# EAGLE board fuente_buck_50v-12v_10A_v_1.1 (EAGLE 7.6.0)
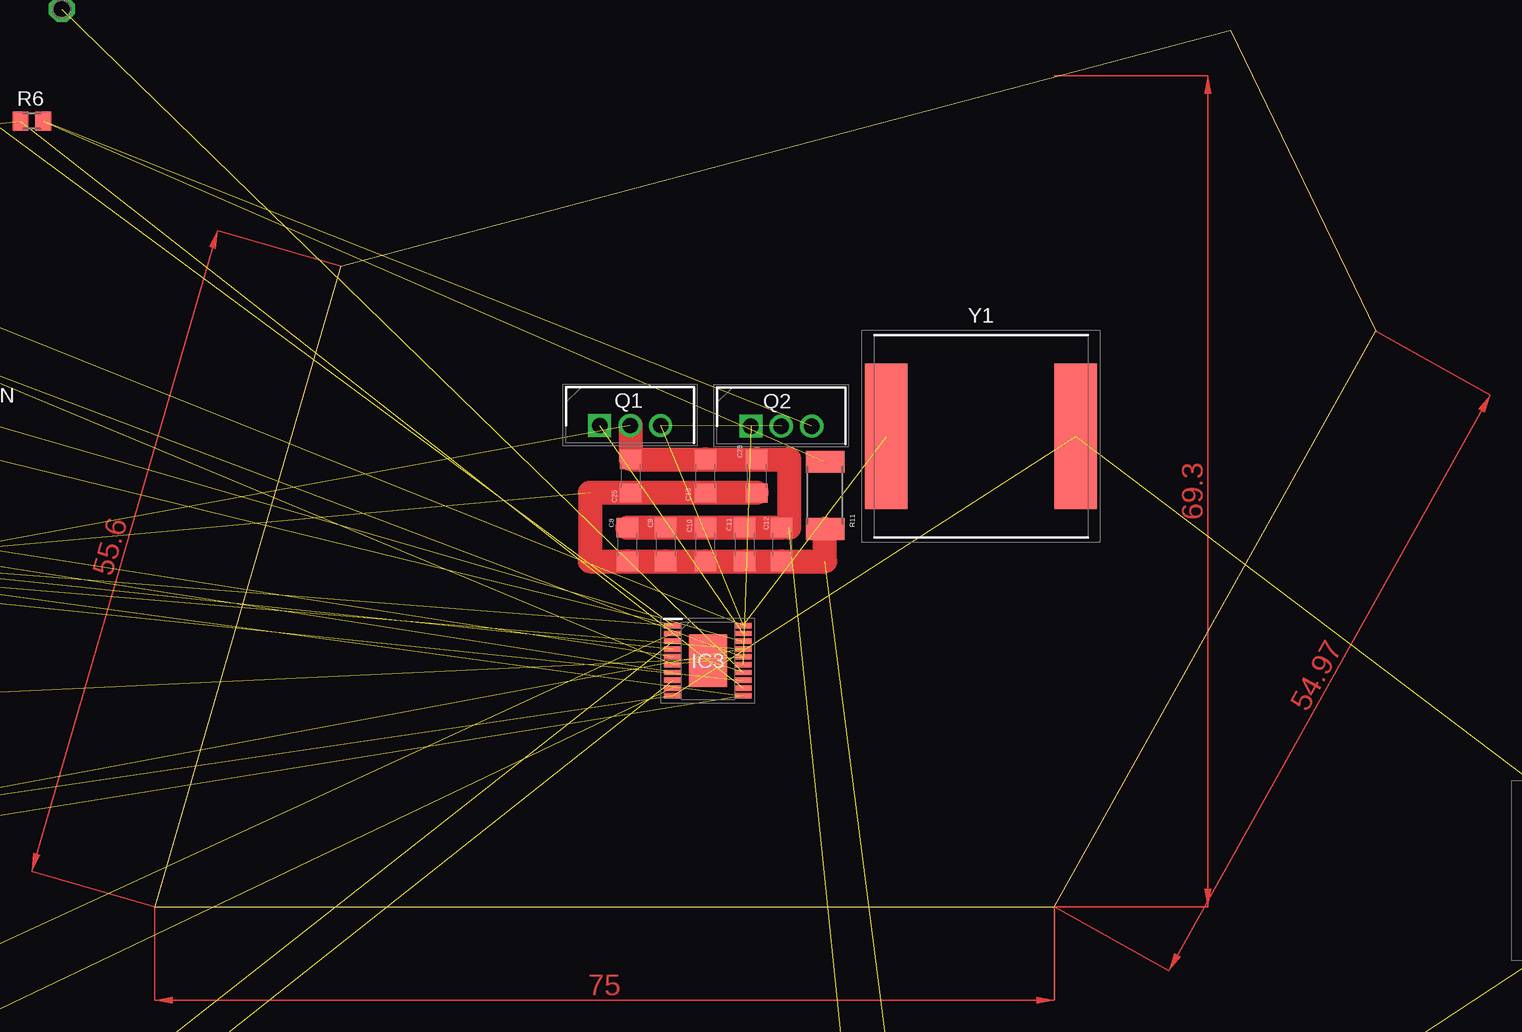
[diagram p0: board, top side]

Size 101.8 x 73.1 mm. Coordinates in mm from the lower left corner, seen from the top.
Outline: 0,0 75,0 101.8,48 89.7,73.1 15.5,53.4 0,0
Copper layers (1*16): Top 0.035mm / dielectric 1.5mm / Bottom 0.035mm
Design rules "default": minimum track width 10mil, minimum drill 24mil, track to track 8mil, track to pad 8mil, pad to pad 8mil, via to via 8mil, smd to smd 8mil, copper to edge 40mil, drill to drill 8mil, minimum pad ring 10mil, minimum via ring 8mil, stop-mask expansion 4mil, vias tented up to drill 0mil, thermal gap 10mil
Net classes: 0 default: width 0.152 mm, drill 0.305 mm, clearance 0.152 mm; 1 power: width 0.127 mm, drill 0.305 mm, clearance 0.127 mm; 2 thin: width 0.508 mm, drill 0.305 mm, clearance 0.152 mm

## Footprints (pad centres in the part's own frame; a part is rotated, then mirrored left to right if it is on the bottom)
2,54/1,1 = drill 1.118 pad 2.54 octagon: 1 0,0
C0805 = smd 1.3 x 1.5: 1 -0.95,0; 2 0.95,0
CAPC1608X90N = smd 0.54 x 0.94: 1 -0.8,0; 2 0.8,0
C1206 = smd 1.6 x 1.8: 1 -1.4,0; 2 1.4,0
EEE0JA152UAP = smd 4.1 x 2: 1 -4.35,0; 2 4.35,0
CAPC3216X180N = smd 1.05 x 1.82: 1 -1.39,0; 2 1.39,0
CAPAE1910X1750N = smd 8 x 2.4: 1 -6.95,0; 2 6.95,0
DIOM5127X229N = smd 2.2 x 1.55: 1 -2.05,0; 2 2.05,0
DIOM5436X261N = smd 2.2 x 2.15: 1 -2.2,0; 2 2.2,0
FUSC3216X123N = smd 1.55 x 1.91: 1 -1.285,0; 2 1.285,0
SOP65P640X110-21N = smd 1.45 x 0.45: 1 -2.925,2.925; 2 -2.925,2.275; 3 -2.925,1.625; 4 -2.925,0.975; 5 -2.925,0.325; 6 -2.925,-0.325; 7 -2.925,-0.975; 8 -2.925,-1.625; 9 -2.925,-2.275; 10 -2.925,-2.925; 11 2.925,-2.925; 12 2.925,-2.275; 13 2.925,-1.625; 14 2.925,-0.975; 15 2.925,-0.325; 16 2.925,0.325; 17 2.925,0.975; 18 2.925,1.625; 19 2.925,2.275; 20 2.925,2.925 | smd 3.15 x 4.35: 21 0,0
397400002 = drill 1.2 pad 1.8 square: 1 0,0 | drill 1.2 pad 1.8: 2 3.81,0
JP1 = drill 0.914 long: 1 0,-1.27; 2 0,1.27
TO254P470X1016X1611-3P = drill 1.28 pad 1.92 square: 1 0,0 | drill 1.28 pad 1.92: 2 2.54,0; 3 5.08,0
M0805 = smd 1.3 x 1.6: 1 -0.95,0; 2 0.95,0
R2512 = smd 1.8 x 3.2: 1 -2.8,0; 2 2.8,0
R0805 = smd 1.3 x 1.5: 1 -0.95,0; 2 0.95,0
P1-13 = drill 1.321 pad 2.159 octagon: TP 0,0
INDPM178169X700N = smd 3.55 x 12.1: 1 -7.9,0; 2 7.9,0

## Placement (x,y rotation side)
+12V  P3  [2,54/1,1]  -26.35,-49.85 0 top  (outside the outline)
C1  0.1uf-x7r _50v  [C0805]  -66.75,55.86 180 top  (outside the outline)
C2  1uf_25v  [C0805]  -48.92,58.24 0 top  (outside the outline)
C3  0.01UF  [C0805]  -84.4,40.53 90 top  (outside the outline)
C4  270PF  [C0805]  -76.05,40.53 90 top  (outside the outline)
C5  100pf_50v  [CAPC1608X90N]  -96.6,3 0 top  (outside the outline)
C6  3300pf_50v  [CAPC1608X90N]  -97.5,0.8 0 top  (outside the outline)
C7  N/A  [C0805]  -52.07,-34.29 0 top  (outside the outline)
C8  2.2uf_100v  [C1206]  39.4,30.2 270 top
C9  2.2uf_100v  [C1206]  42.6,30.2 270 top
C10  2.2uf_100v  [C1206]  45.9,30.2 270 top
C11  2.2uf_100v  [C1206]  49.2,30.2 270 top
C12  1uf_100v  [C1206]  52.3,30.2 270 top
C13  0.1uf_100v  [C1206]  45.9,35.9 270 top
C14  1uf_25v  [C0805]  -35.51,28.44 0 top  (outside the outline)
C15  100pf_50v  [CAPC1608X90N]  -99.3,-9.7 0 top  (outside the outline)
C16  330uf 35v  [EEE0JA152UAP]  119.3,2.7 270 top  (outside the outline)
C17  2.2uf_35v  [CAPC3216X180N]  19.5,-19.4 0 top  (outside the outline)
C18  2.2uf_35v  [CAPC3216X180N]  19.5,-22.7 0 top  (outside the outline)
C19  2.2uf_35v  [CAPC3216X180N]  19.4,-25.7 0 top  (outside the outline)
C20  2.2uf_35v  [CAPC3216X180N]  19.4,-28.9 0 top  (outside the outline)
C21  1uf_35v  [CAPC3216X180N]  19.4,-31.9 0 top  (outside the outline)
C22  1uf_35v  [CAPC3216X180N]  19.4,-35 0 top  (outside the outline)
C23  220pf_50v  [C0805]  -101,-5.5 0 top  (outside the outline)
C24  47pf_50v  [CAPC1608X90N]  -98.9,-1.4 0 top  (outside the outline)
C25  1uf_100v  [C1206]  39.7,35.9 270 top
C26  330uf_100v  [CAPAE1910X1750N]  -105.2,43.2 0 top  (outside the outline)
C28  1uf_100v  [C1206]  50.2,35.9 270 top
D1  SS16-E3_61T  [DIOM5127X229N]  -70.4,15.1 180 top  (outside the outline)
D2  SS16-E3_61T  [DIOM5127X229N]  -70.2,8.9 0 top  (outside the outline)
D3  SMBJ58A  [DIOM5436X261N]  62.2,-37.8 180 top  (outside the outline)
F1  8amp_slow blow  [FUSC3216X123N]  -20.2,71.3 0 top  (outside the outline)
GND  P2  [2,54/1,1]  -53.53,43.17 270 top  (outside the outline)
GND2  P4  [2,54/1,1]  -52.07,-3.81 0 top  (outside the outline)
IC3  LM5116MHX_NOPB  [SOP65P640X110-21N]  46.14,20.51 0 top
J1  39740-0002  [397400002]  -145.3,-29.4 0 top  (outside the outline)
J2  39740-0002  [397400002]  -121.9,-33.9 0 top  (outside the outline)
JMP1  [JP1]  -52.07,2.54 180 top  (outside the outline)
Q1  CSD19506KCS  [TO254P470X1016X1611-3P]  37.12,40.12 0 top
Q2  CSD19506KCS  [TO254P470X1016X1611-3P]  49.71,40.07 0 top
R1  56k  [M0805]  -52.07,-21.59 0 top  (outside the outline)
R2  21k  [M0805]  -52.07,-27.94 0 top  (outside the outline)
R3  10.7 kΩ  [M0805]  -20.17,-36.95 0 top  (outside the outline)
R4  1.21 kΩ  [M0805]  -20.17,-30.6 0 top  (outside the outline)
R5  5.1Ω  [M0805]  -42.85,61.21 270 top  (outside the outline)
R6  4.7Ω  [M0805]  -10.22,65.49 0 top  (outside the outline)
R7  0  [M0805]  -41.19,28.34 0 top  (outside the outline)
R8  10k  [M0805]  -30.13,28.54 0 top  (outside the outline)
R9  12.4k  [M0805]  -52.07,-52.07 0 top  (outside the outline)
R10  18K  [M0805]  -20.17,-11.55 0 top  (outside the outline)
R11  0.0068Ω  [R2512]  55.9,34.3 90 top
R12  N/A  [M0805]  -20.55,8.31 0 top  (outside the outline)
R13  100k  [R0805]  -23.87,28.64 0 top  (outside the outline)
R14  10Ω  [M0805]  -52.07,-15.24 0 top  (outside the outline)
TP1-SYNC  TP1  [P1-13]  -52.07,-64.77 0 top  (outside the outline)
TP2_PGND  TPPAD1-13  [P1-13]  -7.72,74.85 0 top  (outside the outline)
TP3_EN  TPPAD1-13  [P1-13]  -17.44,40.75 0 top  (outside the outline)
TP4_AGND  TPPAD1-13  [P1-13]  -52.07,-46.99 0 top  (outside the outline)
TP5_VCCX  TPPAD1-13  [P1-13]  -27.2,40.65 0 top  (outside the outline)
VIN+50  P1  [2,54/1,1]  -53.59,47.17 0 top  (outside the outline)
Y1  AMDLA1707S-150MT  [INDPM178169X700N]  68.9,39.22 0 top

## Library data of the parts
+12V GND GND2 VIN+50 = wirepad
C1-C4 C7-C14 C23 C25 C28 R1-R10 R12 R14 = rcl
C5 C6 C15 C24 = CGA3E2C0G1H221J080AD; DESCRIPTION: Multilayer Ceramic Capacitors MLCC - SMD/SMT EPXY 0603 50V, AEC-Q200, 220pF; HEIGHT: 0.9mm; MANUFACTURER_NAME: TDK; MANUFACTURER_PART_NUMBER: CGA3E2C0G1H221J080AD; MOUSER_PART_NUMBER: 810-CGA3E2C0G1H221JD; MOUSER_PRICE-STOCK: https://www.mouser.co.uk/ProductDetail/TDK/CGA3E2C0G1H221J080AD?qs=xLDY6iXSiQauXd%252Brvgz98g%3D%3D
C16 = EEEFK1V331P; DESCRIPTION: SMD Aluminium Electrolytic Capacitor,Radial Can - SMD, 330 F, 35 V, FK Series, 2000 hours @ 105C; HEIGHT: 12mm; MANUFACTURER_NAME: Panasonic; MANUFACTURER_PART_NUMBER: EEEFK1V331P
C17-C22 = CL31B225KAHNNNE; DESCRIPTION: Samsung Electro-Mechanics 1206 CL 2.2uF Ceramic Multilayer Capacitor, 25 V, +125C, X7R Dielectric, +/-10% SMD; HEIGHT: 1.8mm; MANUFACTURER_NAME: SAMSUNG; MANUFACTURER_PART_NUMBER: CL31B225KAHNNNE
C26 = UCD2A331MNQ1MS; DESCRIPTION: Nichicon 330F 100V dc Aluminium Electrolytic Capacitor, Surface Mount 18 (Dia.) x 16.5mm +105C 18mm; HEIGHT: 17.5mm; MANUFACTURER_NAME: Nichicon; MANUFACTURER_PART_NUMBER: UCD2A331MNQ1MS
D1 D2 = SS16-E3_61T; DESCRIPTION: Vishay SS16-E3/61T, SMT Schottky Diode, 60V 1A, 2-Pin DO-214AC; HEIGHT: 2.29mm; MANUFACTURER_NAME: Vishay; MANUFACTURER_PART_NUMBER: SS16-E3/61T; MOUSER_PART_NUMBER: 625-SS16-E3; MOUSER_PRICE-STOCK: https://www.mouser.co.uk/ProductDetail/Vishay-General-Semiconductor/SS16-E3-61T?qs=x2jpVgRnAtMiLlJLdPGu3w%3D%3D
D3 = SMBJ58A; DESCRIPTION: Littelfuse SMBJ58A, Uni-Directional TVS Diode, 600W, 2-Pin DO-214AA; HEIGHT: 2.61mm; MANUFACTURER_NAME: LITTELFUSE; MANUFACTURER_PART_NUMBER: SMBJ58A
F1 = SF-1206S800W-2; DESCRIPTION: Surface Mount Fuses 8.0A Slow Blow 1206 SinglFuse; HEIGHT: 1.23mm; MANUFACTURER_NAME: Bourns; MANUFACTURER_PART_NUMBER: SF-1206S800W-2; MOUSER_PART_NUMBER: 652-SF-1206S800W-2; MOUSER_PRICE-STOCK: https://www.mouser.co.uk/ProductDetail/Bourns/SF-1206S800W-2/?qs=fAHHVMwC%252BbhqdiwPMKxViA%3D%3D
IC3 = LM5116MHX_NOPB; DESCRIPTION: 6-100V Wide Vin, Current Mode Synchronous Buck Controller; HEIGHT: 1.1mm; MANUFACTURER_NAME: Texas Instruments; MANUFACTURER_PART_NUMBER: LM5116MHX/NOPB; MOUSER_PART_NUMBER: 926-LM5116MHX/NOPB; MOUSER_PRICE-STOCK: https://www.mouser.co.uk/ProductDetail/Texas-Instruments/LM5116MHX-NOPB?qs=QbsRYf82W3EaCl%2FW15P7yA%3D%3D
J1 J2 = 39740-0002; DESCRIPTION: Pluggable Terminal Blocks EURO TERM BLK VERT 3.81MM 2C-GREEN; HEIGHT: 8.9mm; MANUFACTURER_NAME: Molex; MANUFACTURER_PART_NUMBER: 39740-0002; MOUSER_PART_NUMBER: 538-39740-0002; MOUSER_PRICE-STOCK: https://www.mouser.co.uk/ProductDetail/Molex/39740-0002?qs=PVVDbbWpW3JCaIt2SPtzGA%3D%3D
JMP1 = jumper
Q1 Q2 = CSD19506KCS; DESCRIPTION: Texas Instruments CSD19506KCS N-channel MOSFET Transistor, 273 A, 80 V, 3-Pin TO-220; HEIGHT: 4.7mm; MANUFACTURER_NAME: Texas Instruments; MANUFACTURER_PART_NUMBER: CSD19506KCS; MOUSER_PART_NUMBER: 595-CSD19506KCS; MOUSER_PRICE-STOCK: https://www.mouser.co.uk/ProductDetail/Texas-Instruments/CSD19506KCS?qs=8sOby8ZxZLGQrkLPFGWmvQ%3D%3D
R11 = resistor
R13 = eagle-ltspice; SPICEMODEL: NONE; SPICEPREFIX: R
TP1-SYNC TP2_PGND TP3_EN TP4_AGND TP5_VCCX = testpad
Y1 = AMDLA1707S-150MT; DESCRIPTION: 15 H Shielded Molded Inductor 16 A 15.5mOhm Max Nonstandard -; HEIGHT: 7mm; MANUFACTURER_NAME: ABRACON; MANUFACTURER_PART_NUMBER: AMDLA1707S-150MT; MOUSER_PART_NUMBER: 815-AMDLA1707S-150MT; MOUSER_PRICE-STOCK: https://www.mouser.co.uk/ProductDetail/ABRACON/AMDLA1707S-150MT?qs=DPoM0jnrROXZdMVrsDE%2FmQ%3D%3D

## Nets
10K [power]: C2.1 D1.2 IC3.16
GND [power]: C2.2 C3.2 C4.2 C7.2 C8.2 C9.2 C10.2 C11.2 C12.2 C13.2 C14.1 C16.2 C17.1 C18.1 C19.1 C20.1 C21.1 C22.1 C25.2 C26.2 C28.2 D3.1 GND2.1 GND.1 IC3.6 IC3.14 IC3.21 JMP1.1 R2.1 R4.1 R7.2 R8.2 R9.1 R11.1 R14.1 TP2_PGND.TP TP4_AGND.TP
N$1: C5.1 C6.1 C24.1 IC3.8 R3.2 R4.2
N$3: C23.2 R14.2
N$4: C7.1 D2.2 IC3.2 R1.1 R2.2
N$5: C15.1 IC3.3 R9.2
N$6: C15.2 TP1-SYNC.TP
N$7: C4.1 IC3.5
N$8: C3.1 IC3.7
N$9: C14.2 IC3.17 R12.1 TP5_VCCX.TP
N$10: C5.2 IC3.9 R10.2
N$11: IC3.19 Q1.1
N$12: C6.2 R10.1
N$14: +12V.1 C16.1 C17.2 C18.2 C19.2 C20.2 C21.2 C22.2 C24.2 IC3.10 R3.1 R12.2 Y1.2
N$16: IC3.4 R13.1 TP3_EN.TP
N$17: C1.1 C23.1 IC3.20 Q1.3 Q2.2 R5.2 Y1.1
N$18: IC3.15 Q2.1
N$19: C1.2 D1.1 IC3.18
N$20: IC3.13 R7.1
N$21: Q2.3 R6.2 R11.2
N$23: IC3.11 JMP1.2 R8.1
N$24: IC3.12 R5.1 R6.1
VIN: C8.1 C9.1 C10.1 C11.1 C12.1 C13.1 C25.1 C26.1 C28.1 D2.1 D3.2 F1.1 F1.2 IC3.1 Q1.2 R1.2 R13.2 VIN+50.1

## Tracks (layer width: path | path; a pad name or v marks a point on that pad's centre or on a via)
10K  (2 unrouted)
GND  (28 unrouted)
  Top 2: C28.2 C13.2 | C13.2 C25.2 | R11.1 55.9,28.8 C12.2 C11.2 C10.2 C9.2 C8.2 36.3,28.8 36.3,34.5 C13.2
N$1  (5 unrouted)
N$3  (1 unrouted)
N$4  (4 unrouted)
N$5  (2 unrouted)
N$6  (1 unrouted)
N$7  (1 unrouted)
N$8  (1 unrouted)
N$9  (3 unrouted)
N$10  (2 unrouted)
N$11  (1 unrouted)
N$12  (1 unrouted)
N$14  (12 unrouted)
N$16  (2 unrouted)
N$17  (6 unrouted)
N$18  (1 unrouted)
N$19  (2 unrouted)
N$20  (1 unrouted)
N$21  (2 unrouted)
N$23  (2 unrouted)
N$24  (2 unrouted)
VIN  (9 unrouted)
  Top 2: C13.1 C25.1 39.7,40.12 Q1.2 | C13.1 C28.1 | C8.1 C9.1 C10.1 C11.1 C12.1 52.9,31.6 52.9,37.3 C13.1
(copper drawn outside any net)
  shapes: Top area x4